# Altium PCB LEDControl1.PcbDoc (part 2 of 6)
Units mm, origin at the board's own origin, x right, y up, seen from the top; angles counter-clockwise.
Board outline 380 x 185 mm, 2 copper layers (Top Layer, Bottom Layer), stack 0.533 mm thick; 673 components, 368 nets, 1993 pads, 2553 vias.
Unrouted connection lines stored in the file: 1155.
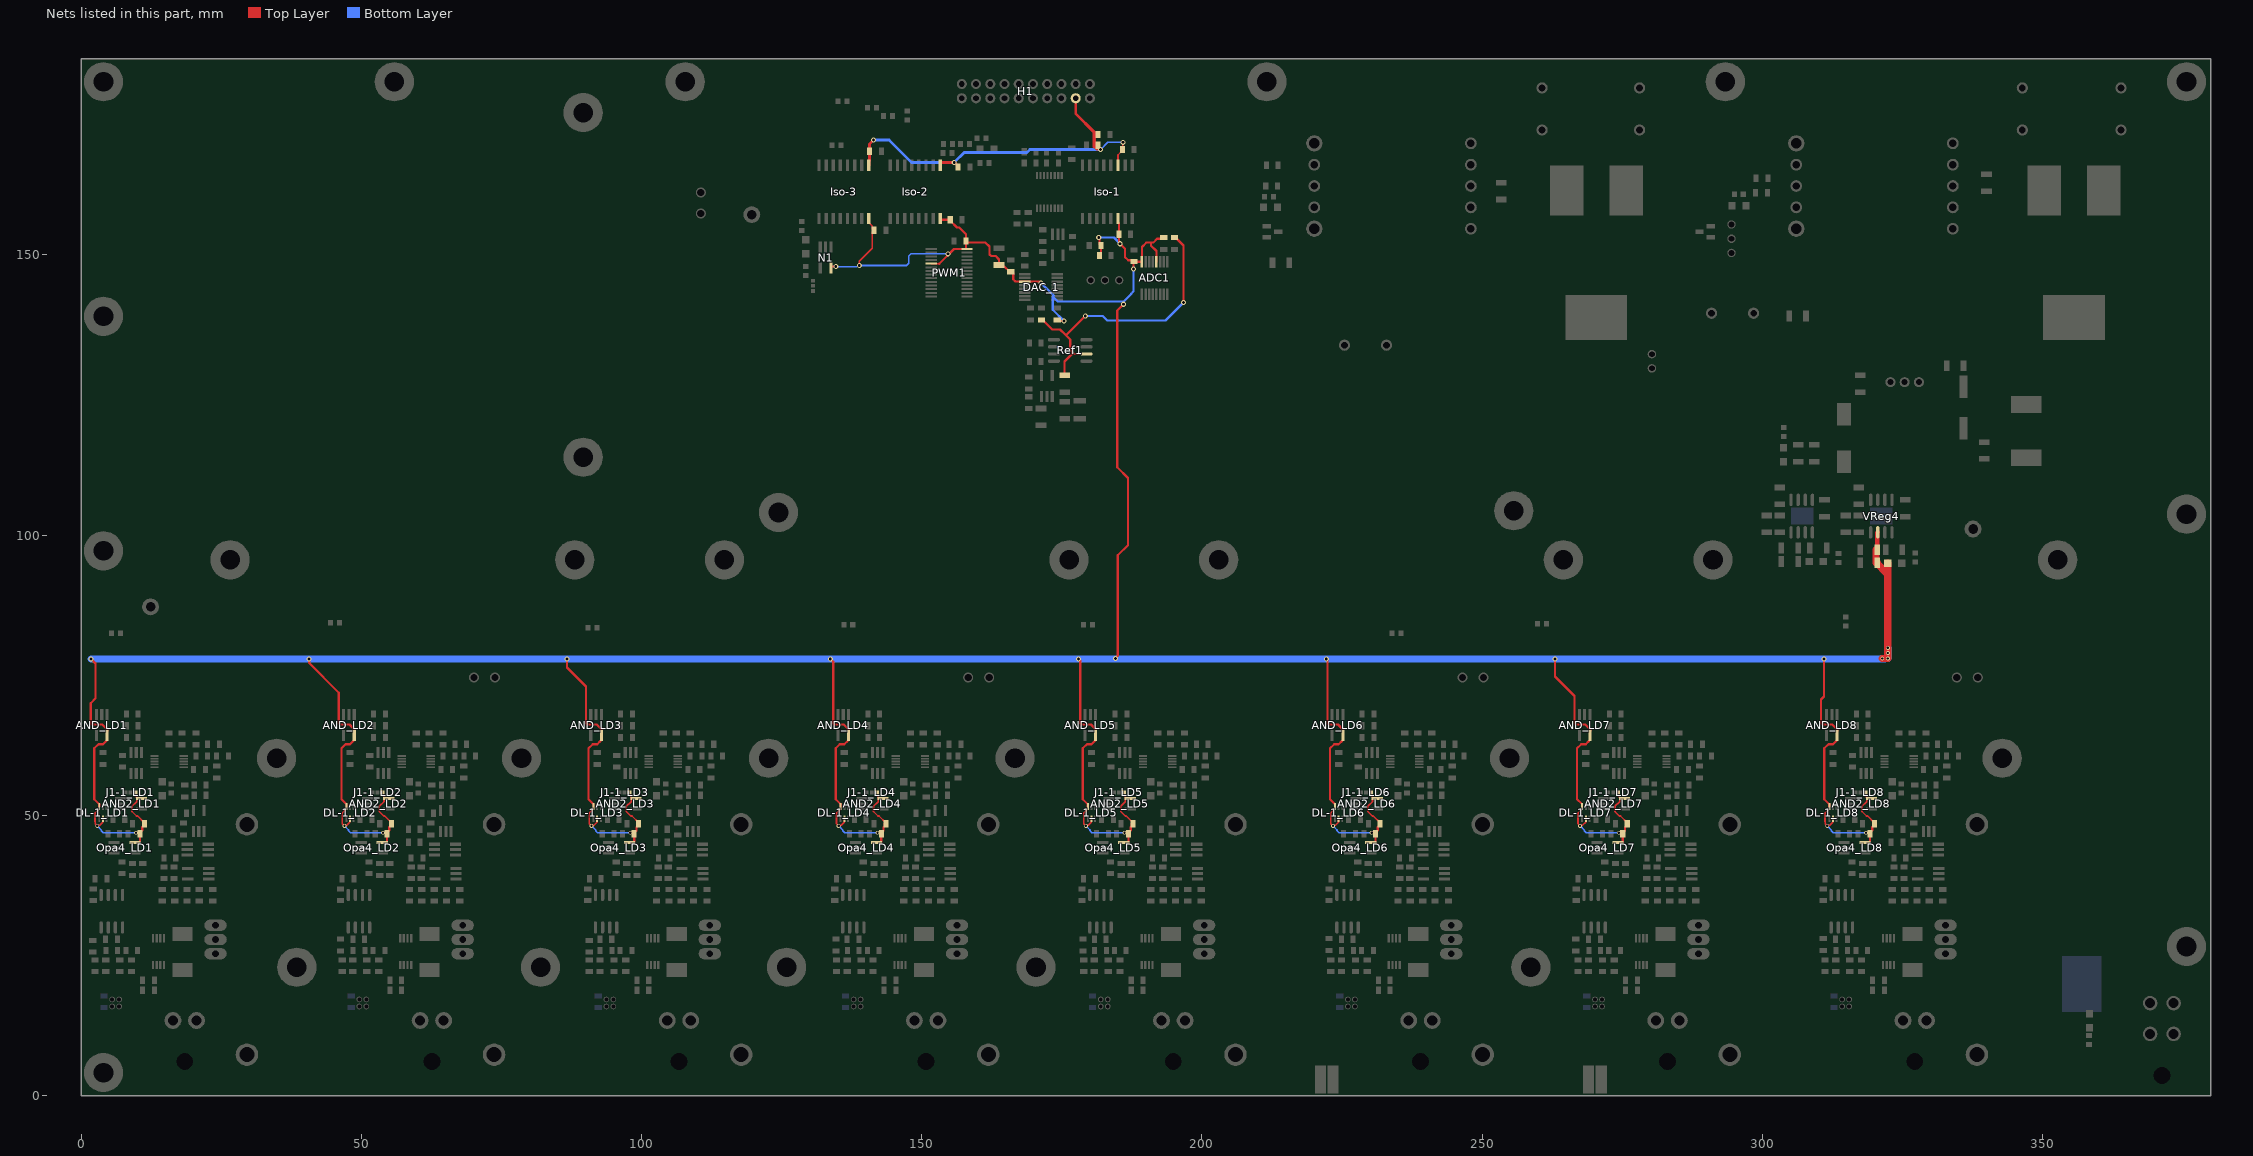
[diagram p2: the nets of this part, all layers, seen from the top]

## Components (designator, comment, footprint, x,y, rotation, side; value= is the part's Value field where it differs from the comment) (continued)
S "0" 0805 22.6,60.6 r180 top (schematic designator R1-4)
S "0" 0805 273.8,39.3 r90 top (schematic designator R1-3)
S "0" 0805 229.7,39.3 r90 top (schematic designator R1-3)
S "0" 0805 141.5,39.3 r90 top (schematic designator R1-3)
S "0" 0805 97.4,39.3 r90 top (schematic designator R1-3)
S "0" 0805 53.3,39.3 r90 top (schematic designator R1-3)
S "0" 0805 9.2,39.3 r90 top (schematic designator R1-3)
S "0" 0805 282.9,48.6 r270 top (schematic designator R1-2)
S "0" 0805 238.8,48.6 r270 top (schematic designator R1-2)
S "0" 0805 150.6,48.6 r270 top (schematic designator R1-2)
S "0" 0805 106.5,48.6 r270 top (schematic designator R1-2)
S "0" 0805 62.4,48.6 r270 top (schematic designator R1-2)
S "0" 0805 18.3,48.6 r270 top (schematic designator R1-2)
Sw1_LD1 "Switch_Analog_1" SOT23-6 18.95,44.85 r0 top (schematic designator Sw1)
Sw1_LD2 "Switch_Analog_1" SOT23-6 63.05,44.85 r0 top (schematic designator Sw1)
Sw1_LD3 "Switch_Analog_1" SOT23-6 107.15,44.85 r0 top (schematic designator Sw1)
Sw1_LD4 "Switch_Analog_1" SOT23-6 151.25,44.85 r0 top (schematic designator Sw1)
Sw1_LD5 "Switch_Analog_1" SOT23-6 195.35,44.85 r0 top (schematic designator Sw1)
Sw1_LD6 "Switch_Analog_1" SOT23-6 239.45,44.85 r0 top (schematic designator Sw1)
Sw1_LD7 "Switch_Analog_1" SOT23-6 283.55,44.85 r0 top (schematic designator Sw1)
Sw1_LD8 "Switch_Analog_1" SOT23-6 327.65,44.85 r0 top (schematic designator Sw1)
Sw2_LD1 "Switch_Analog_2" 10-VSSOP 13.1,60.6 r0 top (schematic designator Sw2)
Sw2_LD2 "Switch_Analog_2" 10-VSSOP 57.2,60.6 r0 top (schematic designator Sw2)
Sw2_LD3 "Switch_Analog_2" 10-VSSOP 101.3,60.6 r0 top (schematic designator Sw2)
Sw2_LD4 "Switch_Analog_2" 10-VSSOP 145.4,60.6 r0 top (schematic designator Sw2)
Sw2_LD5 "Switch_Analog_2" 10-VSSOP 189.5,60.6 r0 top (schematic designator Sw2)
Sw2_LD6 "Switch_Analog_2" 10-VSSOP 233.6,60.6 r0 top (schematic designator Sw2)
Sw2_LD7 "Switch_Analog_2" 10-VSSOP 277.7,60.6 r0 top (schematic designator Sw2)
Sw2_LD8 "Switch_Analog_2" 10-VSSOP 321.8,60.6 r0 top (schematic designator Sw2)
Sw3_LD1 "Switch_Analog_1" SOT23-6 8.9,57.45 r90 top (schematic designator Sw3)
Sw3_LD2 "Switch_Analog_1" SOT23-6 53,57.45 r90 top (schematic designator Sw3)
Sw3_LD3 "Switch_Analog_1" SOT23-6 97.1,57.45 r90 top (schematic designator Sw3)
Sw3_LD4 "Switch_Analog_1" SOT23-6 141.2,57.45 r90 top (schematic designator Sw3)
Sw3_LD5 "Switch_Analog_1" SOT23-6 185.3,57.45 r90 top (schematic designator Sw3)
Sw3_LD6 "Switch_Analog_1" SOT23-6 229.4,57.45 r90 top (schematic designator Sw3)
Sw3_LD7 "Switch_Analog_1" SOT23-6 273.5,57.45 r90 top (schematic designator Sw3)
Sw3_LD8 "Switch_Analog_1" SOT23-6 317.6,57.45 r90 top (schematic designator Sw3)
Sw-1 "MOSFET-N" SOT23-3 211.6,155.1 r0 top
Sw-2 "MOSFET-N" SOT23-3 290.8,153.2 r180 top
T1 "TEstPoint" TestPoint 337.6,101.1 r0 top
T2 "TEstPoint" TestPoint 12.4,87.2 r0 top
T3 "TEstPoint" TestPoint 119.7,157.2 r0 top
VReg3 "5VReg" 8-SOIC 305.13,100.5 r90 top
VReg4 "3V3Reg" 8-SOIC 319.33,100.5 r90 top
Vreg5 "PS1" PowerSupplySwitch 327.94,127.3 r180 top
VReg_1 "VReg_Adj" VReg_SixteenthBrick 248,154.68 r180 top
VReg_2 "VReg_Adj" VReg_SixteenthBrick 334,154.68 r180 top

## Footprints (in the part's own frame and the unit in brackets; to place one, negate y for a bottom-side part, rotate by r counter-clockwise, add the part's x,y. Pads: shape width x height; smd on the part's side, far side on the other; paste and mask are expansions set on the pad)
"6-TSSOP / SC-70-6" [mm]
  rect 1.2x0.35 smd mask+0.05: 1(0,0) 2(0,-0.65) 3(0,-1.3) 4(2.2,-1.3) 5(2.2,-0.65) 6(2.2,0)
8-SOIC [mm]
  oval 2.2x0.6 smd: 1(0,0) 2(0,-1.27) 3(0,-2.54) 4(0,-3.81) 5(5.8,-3.81) 6(5.8,-2.54) 7(5.8,-1.27) 8(5.8,0)
  Top Layer region: 1.7,-3.456 4.1,-3.456 4.1,-0.356 1.7,-0.356
  silkscreen extent 0.38,0.72 0.62,0.97, body extent 0.9,-4.41 4.9,0.6, height 1.75
8-SOIC-NoHeatPad [mm]
  oval 2.2x0.6 smd: 1(0,0) 2(0,-1.27) 3(0,-2.54) 4(0,-3.81) 5(5.8,-3.81) 6(5.8,-2.54) 7(5.8,-1.27) 8(5.8,0)
  silkscreen extent 0.38,0.72 0.62,0.97, body extent 0.9,-4.41 4.9,0.6, height 1.75
8-TSSOP [mm]
  rect 1.45x0.4 smd: 1(0,0) 2(0,-0.65) 3(0,-1.3) 4(0,-1.95) 5(4.8,-1.95) 6(4.8,-1.3) 7(4.8,-0.65) 8(4.8,0)
10-VSSOP [mm]
  rect 1.5x0.3 smd mask+0.02: 1(0,0) 2(0,-0.5) 3(0,-1) 4(0,-1.5) 5(0,-2) 6(5.2,-2) 7(5.2,-1.5) 8(5.2,-1) 9(5.2,-0.5) 10(5.2,0)
  silkscreen extent 1.4,-1.98 3.84,0.15
16-QSOP [mil]
  rect 50x15 smd mask+1.97: 1(0,0) 2(0,-25) 3(0,-50) 4(0,-75) 5(0,-100) 6(0,-125) 7(0,-150) 8(0,-175) 9(230,-175) 10(230,-150) 11(230,-125) 12(230,-100) 13(230,-75) 14(230,-50) 15(230,-25) 16(230,0)
"16-SOIC Wide" [mm]
  rect 2x0.6 smd mask+0.05: 1(0,0) 2(0,-1.27) 3(0,-2.54) 4(0,-3.81) 5(0,-5.08) 6(0,-6.35) 7(0,-7.62) 8(0,-8.89) 9(9.5,-8.89) 10(9.5,-7.62) 11(9.5,-6.35) 12(9.5,-5.08) 13(9.5,-3.81) 14(9.5,-2.54) 15(9.5,-1.27) 16(9.5,0)
16-TSSOP [mm]
  rect 2x0.45 smd mask+0.02: 1(0,0) 2(0,-0.65) 3(0,-1.3) 4(0,-1.95) 5(0,-2.6) 6(0,-3.25) 7(0,-3.9) 8(0,-4.55) 9(5.8,-4.55) 10(5.8,-3.9) 11(5.8,-3.25) 12(5.8,-2.6) 13(5.8,-1.95) 14(5.8,-1.3) 15(5.8,-0.65) 16(5.8,0)
  silkscreen extent 1.4,-4.65 4.4,0.15
28-TSSOP [mm]
  rect 2x0.35 smd mask+0.05: 1(0,0) 2(0,-0.65) 3(0,-1.3) 4(0,-1.95) 5(0,-2.6) 6(0,-3.25) 7(0,-3.9) 8(0,-4.55) 9(0,-5.2) 10(0,-5.85) 11(0,-6.5) 12(0,-7.15) 13(0,-7.8) 14(0,-8.45) 15(6.4,-8.45) 16(6.4,-7.8) 17(6.4,-7.15) 18(6.4,-6.5) 19(6.4,-5.85) 20(6.4,-5.2) 21(6.4,-4.55) 22(6.4,-3.9) 23(6.4,-3.25) 24(6.4,-2.6) 25(6.4,-1.95) 26(6.4,-1.3) 27(6.4,-0.65) 28(6.4,0)
0603 [mm]
  rect 0.9x1 smd mask+0.05: 1(0,0) 2(1.6,0)
0805 [mm]
  rect 0.9x1.3 smd: 1(2.1,0) 2(0,0)
1206 [mm]
  rect 1x1.9 smd mask+0.05: 1(0,0) 2(3,0)
1206_Wide [mm]
  rect 1x2.2 smd mask+0.05: 1(0,0) 2(3.2,0)
2512 [mm]
  rect 2.5x3.6 smd mask+0.05: 1(0,0) 2(6.4,0)
CapElec [mm]
  round 2 hole 1.2 mask+0.05: 1(-3.75,0) 2(3.75,0)
  silkscreen extent -8,-8 8,8
Connector_M5 [mm]
  round 1 hole 0.7 mask+0.05: 1(0,0) 2(0,-1.25) 3(1.25,-1.25) 4(1.25,0)
  silkscreen extent -3.37,-4.62 4.62,3.37
ElectrolyticCapacitor [mm]
  rect 1.5x4 smd: 1(0,-3.7) 2(0,3.7)
  silkscreen extent -4.1,-4.4 4.1,4.4
Fan1 [mm]
  round 7 hole 3.5 mask+0.05: 0(0,0) 0(61.5,0)
  round 1.8 hole 1.3 mask+0.05: 1(43.5,-21) 2(47.25,-21)
  silkscreen extent 10,-21 50,-21
FerriteBead1 [mm]
  rect 4x2.5 smd mask+0.05: 1(0,0) 2(8.5,0)
  silkscreen extent 0,-2 8.5,2
GndConnector [mm]
  rect 10x5 smd mask+0.1: 1(0,2) 2(0,0)
"Header Mini-Fit Jr 172648" [mm]
  round 3 hole 1.8 mask+0.05: 1(-2.1,7.3) 2(2.1,7.3)
  round 0 hole 3 unplated mask+0.05: 3(0,0)
  silkscreen extent -2,-6.6 2,-6.6
"Header Molex Mini-Fit Jr 5569 - duplicate" [mm]
  round 2.6 hole 1.8 mask+0.05: 1(0,0) 2(4.2,0) 3(0,5.5) 4(4.2,5.5)
  round 0 hole 3 unplated mask+0.05: 5(2.1,-7.4)
  silkscreen extent 0,-11 3.81,-11
"HeaderRA 2x10" [mm]
  round 1.8 hole 1 mask+0.05: 1(0,0) 2(2.54,0) 3(5.08,0) 4(7.62,0) 5(10.16,0) 6(12.7,0) 7(15.24,0) 8(17.78,0) 9(20.32,0) 10(22.86,0) 11(22.86,-2.54) 12(20.32,-2.54) 13(17.78,-2.54) 14(15.24,-2.54) 15(12.7,-2.54) 16(10.16,-2.54) 17(7.62,-2.54) 18(5.08,-2.54) 19(2.54,-2.54) 20(0,-2.54)
  silkscreen extent 0,3.5 22.86,3.5
Inductor1 [mm]
  rect 3x5.4 smd: 1(-0.068,-0.142) 2(9.432,-0.142)
  silkscreen extent -1.32,-6.14 10.68,5.86
Inductor_HighC [mm]
  rect 6x9 smd mask+0.05: 1(0,0) 2(10.65,0)
  rect 11x8 smd mask+0.05: 3(5.325,22.65)
  silkscreen extent -8.5,3.81 19.05,22.86
Jumper [mm]
  round 1.5 hole 1.02 mask+0.05: 1(0,0) 2(2.54,0) 3(5.08,0)
Jumper2_Pins [mm]
  round 1.5 hole 1.02 mask+0.05: 1(0,0) 2(2.54,0)
Jumper3B [mm]
  rect 0.7x0.7 smd mask+0.05: 1(0,0) 2(0.9,0) 3(1.8,0)
JumperHighC2 [mm]
  rect 5x2 smd mask+0.15: 1(0,1.31) 2(0,-0.95)
LEDindicator [mm]
  rect 1.3x1.3 smd: 1(0,0) 2(2.5,0)
  Top Layer lines w0.254: 2.5,0 cw(c2.5,0.2) 2.3,0.2
LEDIndicator [mm]
  rect 1.3x1.3 smd: 1(0,0) 2(2.5,0)
  Top Layer lines w0.254: 2.3,0.2 ccw(c2.5,0.2) 2.5,0
MOSFET_w_Heatsink [mm]
  round 4 hole 2.67 mask+0.05: 0(-5.6,20.55) 0(-5.6,-20.55)
  oval 4x2 hole 1.2 mask+0.05: 1(0,-2.54) 2(0,0) 3(0,2.54)
  silkscreen extent -20,-27.5 -2.81,27.5
PowerSupplySwitch [mm]
  round 1.8 hole 1.1: 1(0,0) 2(2.54,0) 3(5.08,0)
  silkscreen extent -3,-2 8,17.6
SOT23-3 [mm]
  rect 1.5x0.8 smd mask+0.02: 1(0,0) 2(0,-1.9) 3(2,-0.95)
SOT23-5 [mm]
  rect 2x0.55 smd mask+0.02: 1(0,0) 2(0,-0.95) 3(0,-1.9) 4(3.75,-1.9) 5(3.75,0)
SOT23-6 [mm]
  rect 2x0.55 smd mask+0.02: 1(0,0) 2(0,-0.95) 3(0,-1.9) 4(3.75,-1.9) 5(3.75,-0.95) 6(3.75,0)
TestPoint [mm]
  round 3 hole 1.7 mask+0.05: 1(0,0)
  silkscreen extent -1.8,-1.8 1.8,1.8
VReg_SixteenthBrick [mm]
  round 2.1 hole 1.3 mask+0.05: 1(0,0) 2(0,-7.62) 3(0,-15.24) 5(27.94,-11.43) 6(27.94,-7.62) 7(27.94,-3.81) 9(0,-3.81) 10(0,-11.43)
  round 2.9 hole 1.85 mask+0.05: 4(27.94,-15.24) 8(27.94,0)
  silkscreen extent -3,-26.5 31,11

## Part data
C1-1 C1-2 C1-3 C1-4 C1-5 C1-6 C1-7 C1-8 C1-10 C1-11 C1-12 C1-13 C1-14 C1-16 C1-99 C3-1 C3-1_LD1 C3-1_LD2 C3-1_LD3 C3-1_LD4 C3-1_LD5 C3-1_LD6 C3-1_LD7 C3-1_LD8 C3-2 C3-2_LD1 C3-2_LD2 C3-2_LD3 C3-2_LD4 C3-2_LD5 C3-2_LD6 C3-2_LD7 C3-2_LD8 C4-1_LD1 C4-1_LD2 C4-1_LD3 C4-1_LD4 C4-1_LD5 C4-1_LD6 C4-1_LD7 C4-1_LD8 C4-2_LD1 C4-2_LD2 C4-2_LD3 C4-2_LD4 C4-2_LD5 C4-2_LD6 C4-2_LD7 C4-2_LD8 C4-3_LD1 C4-3_LD2 C4-3_LD3 C4-3_LD4 C4-3_LD5 C4-3_LD6 C4-3_LD7 C4-3_LD8 C4-4_LD1 C4-4_LD2 C4-4_LD3 C4-4_LD4 C4-4_LD5 C4-4_LD6 C4-4_LD7 C4-4_LD8 C4-5_LD1 C4-5_LD2 C4-5_LD3 C4-5_LD4 C4-5_LD5 C4-5_LD6 C4-5_LD7 C4-5_LD8 C4-6_LD1 C4-6_LD2 C4-6_LD3 C4-6_LD4 C4-6_LD5 C4-6_LD6 C4-6_LD7 C4-6_LD8 C4-7_LD1 C4-7_LD2 C4-7_LD3 C4-7_LD4 C4-7_LD5 C4-7_LD6 C4-7_LD7 C4-7_LD8 C4-8_LD1 C4-8_LD2 C4-8_LD3 C4-8_LD4 C4-8_LD5 C4-8_LD6 C4-8_LD7 C4-8_LD8 C5-1_LD1 C5-1_LD2 C5-1_LD3 C5-1_LD4 C5-1_LD5 C5-1_LD6 C5-1_LD7 C5-1_LD8 C6-1: library part Capacitor1
  C5-1_LD1 C5-1_LD2 C5-1_LD3 C5-1_LD4 C5-1_LD5 C5-1_LD6 C5-1_LD7 C5-1_LD8: Digikey P/N=1276-1066-1-ND
C1-1_LD1 C1-1_LD2 C1-1_LD3 C1-1_LD4 C1-1_LD5 C1-1_LD6 C1-1_LD7 C1-1_LD8 C1-2_LD1 C1-2_LD2 C1-2_LD3 C1-2_LD4 C1-2_LD5 C1-2_LD6 C1-2_LD7 C1-2_LD8 C2-1 C2-1_LD1 C2-1_LD2 C2-1_LD3 C2-1_LD4 C2-1_LD5 C2-1_LD6 C2-1_LD7 C2-1_LD8 C2-2 C2-2_LD1 C2-2_LD2 C2-2_LD3 C2-2_LD4 C2-2_LD5 C2-2_LD6 C2-2_LD7 C2-2_LD8 C2-3 C2-3_LD1 C2-3_LD2 C2-3_LD3 C2-3_LD4 C2-3_LD5 C2-3_LD6 C2-3_LD7 C2-3_LD8 C2-4 C2-4_LD1 C2-4_LD2 C2-4_LD3 C2-4_LD4 C2-4_LD5 C2-4_LD6 C2-4_LD7 C2-4_LD8 C2-5 C2-5_LD1 C2-5_LD2 C2-5_LD3 C2-5_LD4 C2-5_LD5 C2-5_LD6 C2-5_LD7 C2-5_LD8 C2-6 C2-6_LD1 C2-6_LD2 C2-6_LD3 C2-6_LD4 C2-6_LD5 C2-6_LD6 C2-6_LD7 C2-6_LD8 C2-7 C2-7_LD1 C2-7_LD2 C2-7_LD3 C2-7_LD4 C2-7_LD5 C2-7_LD6 C2-7_LD7 C2-7_LD8 C2-8 C2-9 C2-10 C2-11 C2-12 C2-13 C2-14 C2-15 C2-16 C2-17 C2-18 C2-19 C2-20 C2-21 C2-22 C2-23 C4-1 C5-1: library part "Cap 0805", "Capacitor"
  C1-1_LD1 C1-1_LD2 C1-1_LD3 C1-1_LD4 C1-1_LD5 C1-1_LD6 C1-1_LD7 C1-1_LD8 C5-1: Digikey P/N=311-4178-1-ND
  C1-2_LD1 C1-2_LD2 C1-2_LD3 C1-2_LD4 C1-2_LD5 C1-2_LD6 C1-2_LD7 C1-2_LD8: Digikey P/N=399-15465-1-ND
  C2-1 C2-2 C2-3 C2-4 C2-5 C2-6 C2-8 C2-9 C2-10 C2-11 C2-16 C2-17 C2-18 C2-19 C2-20 C2-21: Digikey P/N=490-14439-1-ND
  C2-1_LD1 C2-1_LD2 C2-1_LD3 C2-1_LD4 C2-1_LD5 C2-1_LD6 C2-1_LD7 C2-1_LD8 C2-2_LD1 C2-2_LD2 C2-2_LD3 C2-2_LD4 C2-2_LD5 C2-2_LD6 C2-2_LD7 C2-2_LD8 C2-3_LD1 C2-3_LD2 C2-3_LD3 C2-3_LD4 C2-3_LD5 C2-3_LD6 C2-3_LD7 C2-3_LD8 C2-4_LD1 C2-4_LD2 C2-4_LD3 C2-4_LD4 C2-4_LD5 C2-4_LD6 C2-4_LD7 C2-4_LD8 C2-5_LD1 C2-5_LD2 C2-5_LD3 C2-5_LD4 C2-5_LD5 C2-5_LD6 C2-5_LD7 C2-5_LD8 C2-6_LD1 C2-6_LD2 C2-6_LD3 C2-6_LD4 C2-6_LD5 C2-6_LD6 C2-6_LD7 C2-6_LD8 C2-7_LD1 C2-7_LD2 C2-7_LD3 C2-7_LD4 C2-7_LD5 C2-7_LD6 C2-7_LD7 C2-7_LD8: Digikey P/N="478-13047-1-ND, 13-CC0805GRNPO9BN390CT-ND"
  C2-7 C2-12 C2-13 C2-14 C2-15 C2-22 C2-23: Digikey P/N=587-3485-1-ND
  C4-1: Digikey P/N=445-6984-1-ND
CE-1 CE-2 CE-3 CE-4 CE-5 CE-6: library part CapElectrolytic
  CE-1 CE-2 CE-4 CE-6: Digikey P/N=565-3414-ND
  CE-3 CE-5: Digikey P/N=732-9249-1-ND
CE-7: library part CapElectrolytic2, "ElectrolyticCap", Digikey P/N=PCE5120CT-ND
DL-1_LD1 DL-1_LD2 DL-1_LD3 DL-1_LD4 DL-1_LD5 DL-1_LD6 DL-1_LD7 DL-1_LD8: "D-Latch", Digikey P/N=296-16998-1-ND, FP=6-TSSOP
I1 I2: library part Inductor1, Digikey P/N=732-13630-ND
I3: library part Inductor3, "Inductor", Digikey P/N=732-11747-1-ND
PWM1: "PWM", Digikey P/N=568-11925-1-ND
R0-1 R0-2 R1-1 R1-1_LD1 R1-1_LD2 R1-1_LD3 R1-1_LD4 R1-1_LD5 R1-1_LD6 R1-1_LD7 R1-1_LD8 R1-2 R1-2 R1-2_LD5 R1-3_LD5 R1-3_LD8 R1-4 R1-5_LD1 R1-5_LD2 R1-5_LD3 R1-5_LD4 R1-5_LD5 R1-5_LD6 R1-5_LD7 R1-5_LD8 R1-6_LD5 R1-7_LD5 R2-1_LD1 R2-1_LD2 R2-1_LD3 R2-1_LD4 R2-1_LD5 R2-1_LD6 R2-1_LD7 R2-1_LD8 R3-1 R3-1_LD1 R3-1_LD2 R3-1_LD3 R3-1_LD4 R3-1_LD5 R3-1_LD6 R3-1_LD7 R3-1_LD8 R3-2 R3-2_LD1 R3-2_LD2 R3-2_LD3 R3-2_LD4 R3-2_LD5 R3-2_LD6 R3-2_LD7 R3-2_LD8 R3-3 R3-3_LD1 R3-3_LD2 R3-3_LD3 R3-3_LD4 R3-3_LD5 R3-3_LD6 R3-3_LD7 R3-3_LD8 R3-4 R3-4_LD1 R3-4_LD2 R3-4_LD3 R3-4_LD4 R3-4_LD5 R3-4_LD5 R3-4_LD6 R3-4_LD7 R3-4_LD8 R4-1_LD1 R4-1_LD2 R4-1_LD3 R4-1_LD4 R4-1_LD5 R4-1_LD6 R4-1_LD7 R4-1_LD8 R4-2 R5-1 R5-1_LD1 R5-1_LD2 R5-1_LD3 R5-1_LD4 R5-1_LD5 R5-1_LD6 R5-1_LD7 R5-1_LD8 R5-2 R6-1_LD1 R6-1_LD2 R6-1_LD3 R6-1_LD4 R6-1_LD5 R6-1_LD6 R6-1_LD7 R6-1_LD8 R7-1 R7-1_LD1 R7-1_LD2 R7-1_LD3 R7-1_LD4 R7-1_LD5 R7-1_LD6 R7-1_LD7 R7-1_LD8 R7-2_LD1 R7-2_LD2 R7-2_LD3 R7-2_LD4 R7-2_LD5 R7-2_LD6 R7-2_LD7 R7-2_LD8 R7-3_LD1 R7-3_LD2 R7-3_LD3 R7-3_LD4 R7-3_LD5 R7-3_LD6 R7-3_LD7 R7-3_LD8 R7-4_LD1 R7-4_LD2 R7-4_LD3 R7-4_LD4 R7-4_LD5 R7-4_LD6 R7-4_LD7 R7-4_LD8 R7-5_LD1 R7-5_LD2 R7-5_LD3 R7-5_LD4 R7-5_LD5 R7-5_LD6 R7-5_LD7 R7-5_LD8 R7-6_LD1 R7-6_LD2 R7-6_LD3 R7-6_LD4 R7-6_LD5 R7-6_LD6 R7-6_LD7 R7-6_LD8 R8-1 R8-1_LD1 R8-1_LD2 R8-1_LD3 R8-1_LD4 R8-1_LD5 R8-1_LD6 R8-1_LD7 R8-1_LD8 R9-1 R9-1_LD1 R9-1_LD2 R9-1_LD3 R9-1_LD4 R9-1_LD5 R9-1_LD6 R9-1_LD7 R9-1_LD8 R9-2_LD1 R9-2_LD2 R9-2_LD3 R9-2_LD4 R9-2_LD5 R9-2_LD6 R9-2_LD7 R9-2_LD8 R10-1 R10-1_LD1 R10-1_LD2 R10-1_LD3 R10-1_LD4 R10-1_LD5 R10-1_LD6 R10-1_LD7 R10-1_LD8 R11-1_LD1 R11-1_LD2 R11-1_LD3 R11-1_LD4 R11-1_LD5 R11-1_LD6 R11-1_LD7 R11-1_LD8 R11-2_LD1 R11-2_LD2 R11-2_LD3 R11-2_LD4 R11-2_LD5 R11-2_LD6 R11-2_LD7 R11-2_LD8 R12-1_LD1 R12-1_LD2 R12-1_LD3 R12-1_LD4 R12-1_LD5 R12-1_LD6 R12-1_LD7 R12-1_LD8 R14-1_LD1 R14-1_LD2 R14-1_LD3 R14-1_LD4 R14-1_LD5 R14-1_LD6 R14-1_LD7 R14-1_LD8 RLim-1 RLim-2 RPD_1 RPD_2 RPD_3 RPD_4 RPD_5 RPD_6 RPD_7 RPD_8 RPD_9 RPD_10 RPD_LD1 RPD_LD2 RPD_LD3 RPD_LD4 RPD_LD5 RPD_LD6 RPD_LD7 RPD_LD8 RTrim1 RTrim2 S S S S S S S S S S S S S S S S S S S S S S S S S S S S S S S S S S: library part Res1
  R1-1_LD1 R1-1_LD2 R1-1_LD3 R1-1_LD4 R1-1_LD5 R1-1_LD6 R1-1_LD7 R1-1_LD8 R1-2 R1-2_LD5 R1-3_LD5 R1-3_LD8 S S S S S S S S S S S S: Digikey P/N=511-SDR10EZPF10R0CT-ND
  R1-4 R1-5_LD1 R1-5_LD2 R1-5_LD3 R1-5_LD4 R1-5_LD5 R1-5_LD6 R1-5_LD7 R1-5_LD8 R3-4_LD5 S S S S S S: Digikey P/N=YAG3755CT-ND
  R1-6_LD5 S S S S S S S: Digikey P/N=732-1612-1-ND
  R1-7_LD5 S S S S S S S: Digikey P/N="732-1612-1-ND, 490-BLM21HE601SN1LCT-ND"
  R2-1_LD1 R2-1_LD2 R2-1_LD3 R2-1_LD4 R2-1_LD5 R2-1_LD6 R2-1_LD7 R2-1_LD8: Digikey P/N=738-RNCF0805DTE100RCT-ND,
  R3-1 R3-2: Digikey P/N=541-4663-1-ND
  R3-1_LD1 R3-1_LD2 R3-1_LD3 R3-1_LD4 R3-1_LD5 R3-1_LD6 R3-1_LD7 R3-1_LD8 R3-2_LD1 R3-2_LD2 R3-2_LD3 R3-2_LD4 R3-2_LD5 R3-2_LD6 R3-2_LD7 R3-2_LD8 R3-3_LD1 R3-3_LD2 R3-3_LD3 R3-3_LD4 R3-3_LD5 R3-3_LD6 R3-3_LD7 R3-3_LD8 R3-4_LD1 R3-4_LD2 R3-4_LD3 R3-4_LD4 R3-4_LD5 R3-4_LD6 R3-4_LD7 R3-4_LD8: Digikey P/N=P2.4KBFCT-ND
  R4-1_LD1 R4-1_LD2 R4-1_LD3 R4-1_LD4 R4-1_LD5 R4-1_LD6 R4-1_LD7 R4-1_LD8: Digikey P/N=408-RG2012N-4990-B-T5CT-ND
  R5-1_LD1 R5-1_LD2 R5-1_LD3 R5-1_LD4 R5-1_LD5 R5-1_LD6 R5-1_LD7 R5-1_LD8: Digikey P/N=4506-SEWF2512F3L00P9CT-ND
  R6-1_LD1 R6-1_LD2 R6-1_LD3 R6-1_LD4 R6-1_LD5 R6-1_LD6 R6-1_LD7 R6-1_LD8: Digikey P/N=738-RMCF0805JT12K0CT-ND
  R7-1: Digikey P/N=Y1625500R000B9W-ND
  R7-1_LD1 R7-1_LD2 R7-1_LD3 R7-1_LD4 R7-1_LD5 R7-1_LD6 R7-1_LD7 R7-1_LD8 R7-2_LD1 R7-2_LD2 R7-2_LD3 R7-2_LD4 R7-2_LD5 R7-2_LD6 R7-2_LD7 R7-2_LD8 R7-3_LD1 R7-3_LD2 R7-3_LD3 R7-3_LD4 R7-3_LD5 R7-3_LD6 R7-3_LD7 R7-3_LD8 R7-4_LD1 R7-4_LD2 R7-4_LD3 R7-4_LD4 R7-4_LD5 R7-4_LD6 R7-4_LD7 R7-4_LD8 R7-5_LD1 R7-5_LD2 R7-5_LD3 R7-5_LD4 R7-5_LD5 R7-5_LD6 R7-5_LD7 R7-5_LD8 R7-6_LD1 R7-6_LD2 R7-6_LD3 R7-6_LD4 R7-6_LD5 R7-6_LD6 R7-6_LD7 R7-6_LD8 R11-2_LD1 R11-2_LD2 R11-2_LD3 R11-2_LD4 R11-2_LD5 R11-2_LD6 R11-2_LD7 R11-2_LD8 R14-1_LD1 R14-1_LD2 R14-1_LD3 R14-1_LD4 R14-1_LD5 R14-1_LD6 R14-1_LD7 R14-1_LD8: Digikey P/N=Any
  R8-1: Digikey P/N=Y4023-5.00KDCT-ND
  R8-1_LD1 R8-1_LD2 R8-1_LD3 R8-1_LD4 R8-1_LD5 R8-1_LD6 R8-1_LD7 R8-1_LD8: Digikey P/N=408-2028-1-ND
  R9-1: Digikey P/N="YAG5091CT-ND, RMCF1206ZT0R00CT-ND"
  R10-1: Digikey P/N="RNCF0805BTE100RCT-ND, P20937CT-ND"
  R10-1_LD1 R10-1_LD2 R10-1_LD3 R10-1_LD4 R10-1_LD5 R10-1_LD6 R10-1_LD7 R10-1_LD8: Digikey P/N=TNPU49.9KBBCT-ND
  R11-1_LD1 R11-1_LD2 R11-1_LD3 R11-1_LD4 R11-1_LD5 R11-1_LD6 R11-1_LD7 R11-1_LD8: Digikey P/N=118-CR0805-FX-4993ELFCT-ND
  R12-1_LD1 R12-1_LD2 R12-1_LD3 R12-1_LD4 R12-1_LD5 R12-1_LD6 R12-1_LD7 R12-1_LD8: Digikey P/N=A140898CT-ND
  RLim-1 RLim-2: Digikey P/N=P680KDACT-ND
  RTrim1: Digikey P/N=P20688CT-ND
  RTrim2: Digikey P/N=P21058CT-ND
R2-1 R2-2 R2-3 R2-4 R2-5 R2-6 R2-7 R2-8 R6-1 R13-1_LD1 R13-1_LD2 R13-1_LD3 R13-1_LD4 R13-1_LD5 R13-1_LD6 R13-1_LD7 R13-1_LD8: library part Res1, "Resistor"
  R2-1 R2-2 R2-5 R2-6 R2-7 R2-8 R13-1_LD1 R13-1_LD2 R13-1_LD3 R13-1_LD4 R13-1_LD5 R13-1_LD6 R13-1_LD7 R13-1_LD8: Digikey P/N=2019-RK73B1JTTD201JCT-ND
  R2-3 R2-4: Digikey P/N=P2KBZCT-ND
  R6-1: Digikey P/N=541-4611-1-ND
Ref1: library part 2V5Ref, Digikey P/N=505-ADR4533BRZ-R7CT-ND
VReg3: library part "5V Reg LowNoise", "5V Regulator Low Noise", Digikey P/N=ADM7150ARDZ-5.0-R7CT-ND
VReg4: library part "5V Reg LowNoise", "3V3 Regulator Low Noise", Digikey P/N=505-ADM7150ARDZ-3.3-R7CT-ND
Vreg5: library part PowerSupplySwitching, "PowerSupplySwitching", Digikey P/N=945-2647-5-ND
ADC1: Digikey P/N=296-24101-1-ND
AND2_LD1 AND2_LD2 AND2_LD3 AND2_LD4 AND2_LD5 AND2_LD6 AND2_LD7 AND2_LD8 AND_LD1 AND_LD2 AND_LD3 AND_LD4 AND_LD5 AND_LD6 AND_LD7 AND_LD8: Digikey P/N=296-11601-1-ND
DAC_1: Digikey P/N=AD5669RARUZ-1
F1: Digikey P/N=4816-BPH853025R5-101TCT-ND
Fan1 Fan2 Fan3 Fan4 Fan5: Digikey P/N="603-2189-ND, 36-633-ND"
H1: Digikey P/N="SAM8104-ND, SAM8089-ND"
H2: Digikey P/N="WM23323-ND, 1470-4875-ND"
Iso-1: Digikey P/N=296-ISO1640QDWRQ1CT-ND
Iso-2 Iso-3: Digikey P/N=296-ISO7760FDWRCT-ND
J1-1_LD1 J1-1_LD2 J1-1_LD3 J1-1_LD4 J1-1_LD5 J1-1_LD6 J1-1_LD7 J1-1_LD8 J1-4 J1-5 J1-HB J_FAN: Digikey P/M="609-3461-ND, S9000-ND"
LED1-1 LED1-2 LED1-3 LED1-4 LED1-5 LED1-6 LED7 LED-8 LEDC_1_LD1 LEDC_1_LD2 LEDC_1_LD3 LEDC_1_LD4 LEDC_1_LD5 LEDC_1_LD6 LEDC_1_LD7 LEDC_1_LD8: Digikey=https://www.digikey.co.uk/product-detail/en/osram-opto-semiconductors-inc/LG-R971-KN-1/475-1410-1-ND/1802598, Digikey P/N=475-1410-1-ND
LED1_LD1 LED1_LD2 LED1_LD3 LED1_LD4 LED1_LD5 LED1_LD6 LED1_LD7 LED1_LD8: Digikey P/N="1726480102-ND, 900-2171590220-ND"
M1_LD1 M1_LD2 M1_LD3 M1_LD4 M1_LD5 M1_LD6 M1_LD7 M1_LD8: Digikey P/N="1727-5893-ND, PA-T21-38E-ND, C220-050-2AE-ND, 926-1009-ND"
N1: Digikey P/N=296-11607-1-ND
Opa1_LD1 Opa1_LD2 Opa1_LD3 Opa1_LD4 Opa1_LD5 Opa1_LD6 Opa1_LD7 Opa1_LD8: Digikey P/N="296-LM7321MFE/NOPBCT-ND, 505-AD8615AUJZ-REELCT-ND, MAX44250AUK+CT-ND"
Opa2_LD1 Opa2_LD2 Opa2_LD3 Opa2_LD4 Opa2_LD5 Opa2_LD6 Opa2_LD7 Opa2_LD8 Opa_1 OpAmp-2: Digikey P/N=296-OPA388QDBVRQ1CT-ND
Opa3_LD1 Opa3_LD2 Opa3_LD3 Opa3_LD4 Opa3_LD5 Opa3_LD6 Opa3_LD7 Opa3_LD8: Digikey P/N=296-INA296A3IDGKRCT-ND
Opa4_LD1 Opa4_LD2 Opa4_LD3 Opa4_LD4 Opa4_LD5 Opa4_LD6 Opa4_LD7 Opa4_LD8: Digikey P/N=296-32191-1-ND
Opa5_LD1 Opa5_LD2 Opa5_LD3 Opa5_LD4 Opa5_LD5 Opa5_LD6 Opa5_LD7 Opa5_LD8: Digikey P/N=296-INA821IDRCT-ND
OpAmp-1: Digikey P/N=505-ADUM3195WBRQZ-ND
Photo1_LD1 Photo1_LD2 Photo1_LD3 Photo1_LD4 Photo1_LD5 Photo1_LD6 Photo1_LD7 Photo1_LD8: Digikey P/N="839-1564-ND, 839-10-03879-ND"
Sw1_LD1 Sw1_LD2 Sw1_LD3 Sw1_LD4 Sw1_LD5 Sw1_LD6 Sw1_LD7 Sw1_LD8 Sw3_LD1 Sw3_LD2 Sw3_LD3 Sw3_LD4 Sw3_LD5 Sw3_LD6 Sw3_LD7 Sw3_LD8: Digikey P/N=296-21189-1-ND
Sw2_LD1 Sw2_LD2 Sw2_LD3 Sw2_LD4 Sw2_LD5 Sw2_LD6 Sw2_LD7 Sw2_LD8: Digikey P/N=296-32591-1-ND
Sw-1 Sw-2: Digikey P/N=DMG3402L-7DICT-ND
T1 T2 T3: Digikey P/N=36-5014-ND
VReg_1 VReg_2: Digikey P/N=285-I7A24045A033V-0F3-R-ND

## Free pads (board coordinates)
  round 7 hole 3.5 mask+0.05: 2(38.5,22.9) 3(82,22.9) 4(125.9,22.9) 5(170.4,22.9) 6(258.7,22.9) 7(375.7,26.6) 7(375.7,103.75) 8(34.9,60.2) 9(78.6,60.2) 10(122.7,60.2) 11(166.646,60.2) 12(254.9,60.2) 13(342.8,60.2) 14(375.7,180.9) 15(4,4.1) 15(4,97.2) 15(4,139.05) 15(4,180.9) 15(55.9,180.9) 15(107.8,180.9) 15(124.453,104.052) 15(211.6,180.9) 15(255.653,104.352) 15(293.4,180.9)
  rect 4x3 smd far side mask+0: 16(307.1,103.4) 17(321.2,103.4)

## Via types
v1: diameter 0.7, hole 0.4, Top Layer to Bottom Layer, tented both sides, 1874 vias
v2: diameter 0.8, hole 0.5, Top Layer to Bottom Layer, tented both sides, 512 vias
v3: diameter 0.9, hole 0.5, Top Layer to Bottom Layer, tented both sides, 158 vias
v4: diameter 1.27, hole 0.711, Top Layer to Bottom Layer, tented both sides, 8 vias
v5: diameter 1.2, hole 0.7, Top Layer to Bottom Layer, tented both sides, 1 vias

## Nets (pads, with @x,y where several pads share a name; then routed paths per layer and width w, separated by ;. In a path a pad name is that pad's centre, name@x,y a point inside that pad or via, vN(x,y) a via of type N, cw(c..) or ccw(c..) an arc to the next point about the centre after c; other vN are vias at no path point)
3V3: ADC1.12 ADC1.16 AND2_LD1.5 AND2_LD2.5 AND2_LD3.5 AND2_LD4.5 AND2_LD5.5 AND2_LD6.5 AND2_LD7.5 AND2_LD8.5 AND_LD1.5 AND_LD2.5 AND_LD3.5 AND_LD4.5 AND_LD5.5 AND_LD6.5 AND_LD7.5 AND_LD8.5 C1-2.1 C1-4.2 C1-6.2 C1-10.2 C1-13.2 C1-14.1 C2-3.2 C2-4.2 C2-23.2 C4-7_LD1.1 C4-7_LD2.1 C4-7_LD3.1 C4-7_LD4.1 C4-7_LD5.1 C4-7_LD6.1 C4-7_LD7.1 C4-7_LD8.1 DAC_1.3 DL-1_LD1.3 DL-1_LD1.5 DL-1_LD2.3 DL-1_LD2.5 DL-1_LD3.3 DL-1_LD3.5 DL-1_LD4.3 DL-1_LD4.5 DL-1_LD5.3 DL-1_LD5.5 DL-1_LD6.3 DL-1_LD6.5 DL-1_LD7.3 DL-1_LD7.5 DL-1_LD8.3 DL-1_LD8.5 Iso-1.14 Iso-2.16 Iso-3.16 J1-1_LD1.3 J1-1_LD2.3 J1-1_LD3.3 J1-1_LD4.3 J1-1_LD5.3 J1-1_LD6.3 J1-1_LD7.3 J1-1_LD8.3 LED1-1.2 N1.5 Opa4_LD1.5 Opa4_LD2.5 Opa4_LD3.5 Opa4_LD4.5 Opa4_LD5.5 Opa4_LD6.5 Opa4_LD7.5 Opa4_LD8.5 PWM1.5 PWM1.28 R1-1.1 R1-2.2@182,151.7 R4-2.1 R5-2.1 R6-1_LD1.1 R6-1_LD2.1 R6-1_LD3.1 R6-1_LD4.1 R6-1_LD5.1 R6-1_LD6.1 R6-1_LD7.1 R6-1_LD8.1 VReg4.2 | length 983.4
  Top Layer w0.3: DL-1_LD1.3@3.25,51.6 3.25,51.175 2.5,50.425 2.5,48.88 2.507,48.873 2.507,48.517 v1(2.891,48.133) 2.968,48.209 3.329,48.209 3.875,48.755 3.875,49.375 DL-1_LD1.5@3.9,49.4 ; J1-1_LD1.3@9.7,53.9 9.9,53.7 9.9,53.175 AND2_LD1.5@10.075,53 ; v1(9.8,46.9) 10.3,46.9 R6-1_LD1.1@10.5,46.7 ; AND2_LD1.5@10.8,53 AND2_LD1.5@10.075,53 ; C4-7_LD1.1@11.3,48.5 11.3,48.7 10.1,49.9 9.9,49.9 9.1,50.7 9.1,51.6 9.95,52.45 9.95,52.875 AND2_LD1.5@10.075,53 ; DL-1_LD2.3@47.35,51.6 47.35,51.175 46.6,50.425 46.6,48.88 46.607,48.873 46.607,48.517 v1(46.991,48.133) 47.068,48.209 47.429,48.209 47.975,48.755 47.975,49.375 DL-1_LD2.5@48,49.4 ; J1-1_LD2.3@53.8,53.9 54,53.7 54,53.175 AND2_LD2.5@54.175,53 ; v1(53.9,46.9) 54.4,46.9 R6-1_LD2.1@54.6,46.7 ; AND2_LD2.5@54.9,53 AND2_LD2.5@54.175,53 ; C4-7_LD2.1@55.4,48.5 55.4,48.7 54.2,49.9 54,49.9 53.2,50.7 53.2,51.6 54.05,52.45 54.05,52.875 AND2_LD2.5@54.175,53 ; DL-1_LD3.3@91.45,51.6 91.45,51.175 90.7,50.425 90.7,48.88 90.707,48.873 90.707,48.517 v1(91.091,48.133) 91.168,48.209 91.529,48.209 92.075,48.755 92.075,49.375 DL-1_LD3.5@92.1,49.4 ; J1-1_LD3.3@97.9,53.9 98.1,53.7 98.1,53.175 AND2_LD3.5@98.275,53 ; v1(98,46.9) 98.5,46.9 R6-1_LD3.1@98.7,46.7 ; AND2_LD3.5@99,53 AND2_LD3.5@98.275,53 ; C4-7_LD3.1@99.5,48.5 99.5,48.7 98.3,49.9 98.1,49.9 97.3,50.7 97.3,51.6 98.15,52.45 98.15,52.875 AND2_LD3.5@98.275,53 ; N1.5@133.8,147.65 133.8,147.801 133.925,147.926 v3(134.681,147.926) ; DL-1_LD4.3@135.55,51.6 135.55,51.175 134.8,50.425 134.8,48.88 134.807,48.873 134.807,48.517 v1(135.191,48.133) 135.268,48.209 135.629,48.209 136.175,48.755 136.175,49.375 DL-1_LD4.5@136.2,49.4 ; v3(138.874,148.133) 138.874,148.874 141.2,151.2 141.2,154.1 C1-6.2@141.5,154.4 141.2,154.7 141.2,155.18 140.58,155.8 Iso-3.16@140.58,156.5 ; J1-1_LD4.3@142,53.9 142.2,53.7 142.2,53.175 AND2_LD4.5@142.375,53 ; v1(142.1,46.9) 142.6,46.9 R6-1_LD4.1@142.8,46.7 ; AND2_LD4.5@143.1,53 AND2_LD4.5@142.375,53 ; C4-7_LD4.1@143.6,48.5 143.6,48.7 142.4,49.9 142.2,49.9 141.4,50.7 141.4,51.6 142.25,52.45 142.25,52.875 AND2_LD4.5@142.375,53 ; PWM1.5@151.7,148.45 153.15,148.45 ; DL-1_LD5.3@179.65,51.6 179.65,51.175 178.9,50.425 178.9,48.88 178.907,48.873 178.907,48.517 v1(179.291,48.133) 179.368,48.209 179.729,48.209 180.275,48.755 180.275,49.375 DL-1_LD5.5@180.3,49.4 ; J1-1_LD5.3@186.1,53.9 186.3,53.7 186.3,53.175 AND2_LD5.5@186.475,53 ; v1(186.2,46.9) 186.7,46.9 R6-1_LD5.1@186.9,46.7 ; AND2_LD5.5@187.2,53 AND2_LD5.5@186.475,53 ; C4-7_LD5.1@187.7,48.5 187.7,48.7 186.5,49.9 186.3,49.9 185.5,50.7 185.5,51.6 186.35,52.45 186.35,52.875 AND2_LD5.5@186.475,53 ; DL-1_LD6.3@223.75,51.6 223.75,51.175 223,50.425 223,48.88 223.007,48.873 223.007,48.517 v1(223.391,48.133) 223.468,48.209 223.829,48.209 224.375,48.755 224.375,49.375 DL-1_LD6.5@224.4,49.4 ; J1-1_LD6.3@230.2,53.9 230.4,53.7 230.4,53.175 AND2_LD6.5@230.575,53 ; v1(230.3,46.9) 230.8,46.9 R6-1_LD6.1@231,46.7 ; AND2_LD6.5@231.3,53 AND2_LD6.5@230.575,53 ; C4-7_LD6.1@231.8,48.5 231.8,48.7 230.6,49.9 230.4,49.9 229.6,50.7 229.6,51.6 230.45,52.45 230.45,52.875 AND2_LD6.5@230.575,53 ; DL-1_LD7.3@267.85,51.6 267.85,51.175 267.1,50.425 267.1,48.88 267.107,48.873 267.107,48.517 v1(267.491,48.133) 267.568,48.209 267.929,48.209 268.475,48.755 268.475,49.375 DL-1_LD7.5@268.5,49.4 ; J1-1_LD7.3@274.3,53.9 274.5,53.7 274.5,53.175 AND2_LD7.5@274.675,53 ; v1(274.4,46.9) 274.9,46.9 R6-1_LD7.1@275.1,46.7 ; AND2_LD7.5@275.4,53 AND2_LD7.5@274.675,53 ; C4-7_LD7.1@275.9,48.5 275.9,48.7 274.7,49.9 274.5,49.9 273.7,50.7 273.7,51.6 274.55,52.45 274.55,52.875 AND2_LD7.5@274.675,53 ; DL-1_LD8.3@311.95,51.6 311.95,51.175 311.2,50.425 311.2,48.88 311.207,48.873 311.207,48.517 v1(311.591,48.133) 311.668,48.209 312.029,48.209 312.575,48.755 312.575,49.375 DL-1_LD8.5@312.6,49.4 ; J1-1_LD8.3@318.4,53.9 318.6,53.7 318.6,53.175 AND2_LD8.5@318.775,53 ; v1(318.5,46.9) 319,46.9 R6-1_LD8.1@319.2,46.7 ; AND2_LD8.5@319.5,53 AND2_LD8.5@318.775,53 ; C4-7_LD8.1@320,48.5 320,48.7 318.8,49.9 318.6,49.9 317.8,50.7 317.8,51.6 318.65,52.45 318.65,52.875 AND2_LD8.5@318.775,53
  Top Layer w0.4: v3(1.8,77.9) 2.6,77.1 2.6,70.896 1.714,70.01 1.714,66.434 1.948,66.2 3.8,66.2 4.7,65.3 AND_LD1.5@4.7,65.1 ; DL-1_LD1.3@3.25,51.6 3.25,51.975 2.356,52.869 2.356,61.956 3.1,62.7 3.9,62.7 AND_LD1.5@4.487,63.287 ; Opa4_LD1.5@9.65,45.15 10.375,45.15 10.5,45.275 R6-1_LD1.1@10.5,46.7 10.5,46.9 10.9,47.3 10.9,47.9 11.1,48.1 C4-7_LD1.1@11.1,48.5 ; v3(40.7,77.9) 40.7,77.2 46.004,71.896 46.004,66.434 46.238,66.2 47.9,66.2 48.8,65.3 AND_LD2.5@48.8,65.1 ; DL-1_LD2.3@47.35,51.6 47.35,51.975 46.456,52.869 46.456,61.956 47.2,62.7 48,62.7 AND_LD2.5@48.587,63.287 ; Opa4_LD2.5@53.75,45.15 54.475,45.15 54.6,45.275 R6-1_LD2.1@54.6,46.7 54.6,46.9 55,47.3 55,47.9 55.2,48.1 C4-7_LD2.1@55.2,48.5 ; v3(86.7,77.9) 86.7,76.4 90.104,72.996 90.104,66.434 90.338,66.2 92,66.2 92.9,65.3 AND_LD3.5@92.9,65.1 ; DL-1_LD3.3@91.45,51.6 91.45,51.975 90.556,52.869 90.556,61.956 91.3,62.7 92.1,62.7 AND_LD3.5@92.687,63.287 ; Opa4_LD3.5@97.85,45.15 98.575,45.15 98.7,45.275 R6-1_LD3.1@98.7,46.7 98.7,46.9 99.1,47.3 99.1,47.9 99.3,48.1 C4-7_LD3.1@99.3,48.5 ; v3(133.7,77.9) 134.204,77.396 134.204,66.434 134.438,66.2 136.1,66.2 137,65.3 AND_LD4.5@137,65.1 ; DL-1_LD4.3@135.55,51.6 135.55,51.975 134.656,52.869 134.656,61.956 135.4,62.7 136.2,62.7 AND_LD4.5@136.787,63.287 ; Opa4_LD4.5@141.95,45.15 142.675,45.15 142.8,45.275 R6-1_LD4.1@142.8,46.7 142.8,46.9 143.2,47.3 143.2,47.9 143.4,48.1 C4-7_LD4.1@143.4,48.5 ; 153.15,148.45 155.75,151.05 PWM1.28@158.1,151.05 ; Iso-2.16@153.31,156.5 153.31,156.4 153.41,156.3 C1-4.2@155.1,156.3 155.1,156.1 156.3,154.9 156.7,154.9 157.9,153.7 C1-13.2@157.9,152.5 C1-13.2@157.9,152.45 ; PWM1.28@157.9,151.075 C1-13.2@157.9,152.45 ; C2-23.2@163.7,148.2 164,147.9 164.8,147.9 165.7,147 166.1,147 166.35,146.75 166.35,145.65 166.725,145.275 168.375,145.275 DAC_1.3@168.4,145.25 171.05,145.25 v3(171.3,145) ; C2-23.2@163.8,148.2 163.8,149.2 163.2,149.8 162.4,149.8 162.1,150.1 162.1,151.5 161.4,152.2 158.15,152.2 C1-13.2@157.9,152.45 ; R5-2.1@174.2,138.4 174.4,138.2 v3(175.4,138.2) ; v3(177.996,77.902) 178.304,77.594 178.304,66.434 178.538,66.2 180.2,66.2 181.1,65.3 AND_LD5.5@181.1,65.1 ; DL-1_LD5.3@179.65,51.6 179.65,51.975 178.756,52.869 178.756,61.956 179.5,62.7 180.3,62.7 AND_LD5.5@180.887,63.287 ; v3(181.6,153.1) 181.75,152.95 181.75,151.95 R1-2.2@182,151.7 182,150.4 181.7,150.1 R1-1.1@181.7,149.9 ; v3(184.6,78) 184.6,78.084 185,78.484 185,96.4 186.8,98.2 186.8,110.2 184.888,112.112 184.888,140.088 v3(186,141.2) ; Iso-1.14@185.04,156.5 185.04,155.8 185.2,155.64 C1-2.1@185.2,153.7 v3@185.2,152.335 ; v3(185.4,152) 186.3,151.1 186.3,149.6 186.85,149.05 187.65,149.05 C1-10.2@187.9,148.8 ; Opa4_LD5.5@186.05,45.15 186.775,45.15 186.9,45.275 R6-1_LD5.1@186.9,46.7 186.9,46.9 187.3,47.3 187.3,47.9 187.5,48.1 C4-7_LD5.1@187.5,48.5 ; v3(187.8,147.5) 187.8,148.7 C1-10.2@187.9,148.8 ; ADC1.12@191.9,148.8 191.9,150.69 190.9,151.69 190.9,152.2 ; R4-2.1@193.2,153.1 193,152.9 192,152.9 191.3,152.2 190.9,152.2 ; v3(222.2,77.9) 222.404,77.696 222.404,66.434 222.638,66.2 224.3,66.2 225.2,65.3 AND_LD6.5@225.2,65.1 ; DL-1_LD6.3@223.75,51.6 223.75,51.975 222.856,52.869 222.856,61.956 223.6,62.7 224.4,62.7 AND_LD6.5@224.987,63.287 ; Opa4_LD6.5@230.15,45.15 230.875,45.15 231,45.275 R6-1_LD6.1@231,46.7 231,46.9 231.4,47.3 231.4,47.9 231.6,48.1 C4-7_LD6.1@231.6,48.5 ; v3(263,77.9) 263,74.8 266.504,71.296 266.504,66.434 266.738,66.2 268.4,66.2 269.3,65.3 AND_LD7.5@269.3,65.1 ; DL-1_LD7.3@267.85,51.6 267.85,51.975 266.956,52.869 266.956,61.956 267.7,62.7 268.5,62.7 AND_LD7.5@269.087,63.287 ; Opa4_LD7.5@274.25,45.15 274.975,45.15 275.1,45.275 R6-1_LD7.1@275.1,46.7 275.1,46.9 275.5,47.3 275.5,47.9 275.7,48.1 C4-7_LD7.1@275.7,48.5 ; v3(311,77.9) 311,71.2 310.469,70.669 310.469,66.434 310.704,66.2 312.5,66.2 313.4,65.3 AND_LD8.5@313.4,65.1 ; DL-1_LD8.3@311.95,51.6 311.95,51.975 311.056,52.869 311.056,61.956 311.8,62.7 312.6,62.7 AND_LD8.5@313.187,63.287 ; Opa4_LD8.5@318.35,45.15 319.075,45.15 319.2,45.275 R6-1_LD8.1@319.2,46.7 319.2,46.9 319.6,47.3 319.6,47.9 319.8,48.1 C4-7_LD8.1@319.8,48.5 ; C1-10.2@187.9,148.8 ADC1.16@189.3,148.8 189.3,151.409 190.091,152.2 190.9,152.2
  Top Layer w0.8: C2-3.2@320.5,97.4 320.55,97.45 320.55,100.45 VReg4.2@320.6,100.5
  Top Layer w1.3: C2-4.2@320.3,95.1 C2-3.2@320.3,97.4 ; C2-4.2@320.5,95.1 320.5,94.95 322.05,93.4 322.4,93.4 ; v1(321.4,78) v1(322.4,78) v1(322.4,79.9) 322.4,93.4 ; LED1-1.2@322.4,95 322.4,93.4
  Bottom Layer w0.3: v1(2.891,48.133) 3.624,47.4 3.624,47.243 3.967,46.9 v1(9.8,46.9) ; v1(46.991,48.133) 47.724,47.4 47.724,47.243 48.067,46.9 v1(53.9,46.9) ; v1(91.091,48.133) 91.824,47.4 91.824,47.243 92.167,46.9 v1(98,46.9) ; v3(134.681,147.926) 134.687,147.919 v3@138.498,147.919 ; v1(135.191,48.133) 135.924,47.4 135.924,47.243 136.267,46.9 v1(142.1,46.9) ; v3(138.874,148.133) 147.333,148.133 147.7,148.5 147.7,149.8 148.1,150.2 v3(154.7,150.2) ; v1(179.291,48.133) 180.024,47.4 180.024,47.243 180.367,46.9 v1(186.2,46.9) ; v1(223.391,48.133) 224.124,47.4 224.124,47.243 224.467,46.9 v1(230.3,46.9) ; v1(267.491,48.133) 268.224,47.4 268.224,47.243 268.567,46.9 v1(274.4,46.9) ; v1(311.591,48.133) 312.324,47.4 312.324,47.243 312.667,46.9 v1(318.5,46.9)
  Bottom Layer w0.4: v3(171.3,145) 173.55,142.75 173.4,142.6 ; v3(175.4,138.2) 173.4,140.2 173.4,142.6 ; v3(181.6,153.1) 184.3,153.1 v3(185.4,152) ; v3(187.8,147.5) 187.8,143.5 187.4,143.1 187.413,143.1 187.431,143.082 186.049,141.7 174.3,141.7 173.4,142.6
  Bottom Layer w1.3: v3(1.8,77.9) v3(86.7,77.9) v3(133.7,77.9) 185.8,77.9 ; 185.9,77.9 v3(222.2,77.9) v3(263,77.9) v3(311,77.9) 321.9,77.9 ; v1(322.4,78) v1(322.4,79.9)
  other v1: 322.4,78.95
3V3_IN: C1-1.1 C1-3.2 C1-5.2 H1.12 Iso-1.3 Iso-2.1 Iso-3.1 R0-1.1 R0-2.2 | length 73
  Top Layer w0.3: Iso-1.3@185.04,166 185.04,167.84 185.8,168.6 C1-1.1@185.8,168.8 185.9,168.9 v3(185.9,170.1)
  Top Layer w0.5: Iso-3.1@140.58,166 140.58,166.7 140.7,166.82 C1-5.2@140.7,168.5 140.7,169.8 v3(141.4,170.5) ; Iso-2.1@153.31,166 Iso-2.1@153.31,166.45 ; Iso-2.1@153.31,166.7 Iso-2.1@153.31,166.45 ; C1-3.2@156.5,165.7 156.5,165.9 155.9,166.5 v3(155.8,166.5) 153.36,166.5 Iso-2.1@153.31,166.45 ; H1.12@177.48,177.96 177.48,175.22 180.8,171.9 ; 180.8,169.3 181.223,168.877 v3@181.5,168.877 ; R0-1.1@181.4,171.4 R0-1.1@181.5,171.5
  Top Layer w0.6: 180.8,169.3 180.8,171.4 ; 180.8,171.9 180.8,171.4 ; R0-1.1@181.4,171.4 180.8,171.4
  Bottom Layer w0.3: v3(181.9,168.8) 183.2,170.1 v3(185.9,170.1)
  Bottom Layer w0.5: v3(141.4,170.5) 144.2,170.5 148.2,166.5 v3(155.8,166.5) 157.6,168.3 168.8,168.3 169.3,168.8 v3(181.9,168.8)
3V3Ref: R8-1.1 Ref1.6 S.1@171.4,138.4 S.2@195.1,153.1 | length 52.8
  Top Layer w0.4: S.1@171.4,138.4 171.6,138.4 173.3,136.7 174.7,136.7 175.6,135.8 ; R8-1.1@175.5,128.5 175.5,131 177.017,132.517 ; v3(179.2,139.1) 175.9,135.8 175.6,135.8 ; Ref1.6@179.4,132.33 177.204,132.33 177.017,132.517 ; S.2@195.1,153.1 195.3,153.1 196.7,151.7 v3(196.7,141.5) ; 175.6,135.8 176.5,134.9 176.5,133.034 177.017,132.517
  Bottom Layer w0.4: v3(179.2,139.1) 182.3,139.1 183.1,138.3 193.5,138.3 v3(196.7,141.5)

## Text inside footprints (layer, text, board x,y; h text height)
ADC1: Top Overlay "1" at 190.3,144.8 h0.8 r90
CE-1: Top Overlay "+" at 261.172,166.679 h0.8 r90
CE-2: Top Overlay "+" at 219.829,133.428 h0.8
CE-3: Top Overlay "+" at 278.572,166.679 h0.8 r90
CE-4: Top Overlay "+" at 304.071,140.072 h0.8 r180
CE-5: Top Overlay "+" at 364.472,166.679 h0.8 r90
CE-6: Top Overlay "+" at 346.872,166.679 h0.8 r90
DAC_1: Top Overlay "1" at 170.2,145.55 h0.8
Fan1: Top Overlay "+" at 69.338,75.83 h2
Fan2: Top Overlay "+" at 157.538,75.83 h2
Fan3: Top Overlay "+" at 245.738,75.83 h2
Fan4: Top Overlay "+" at 333.938,75.83 h2
Fan5: Top Overlay "+" at 109.37,156.638 h2 r90
J1-4: Top Overlay "3" at 185.096,143.286 h0.8; Top Overlay "2" at 182.556,143.286 h0.8; Top Overlay "1" at 180.016,143.286 h0.8
J1-5: Top Overlay "1" at 296.714,150.216 h0.8 r90; Top Overlay "2" at 296.714,152.756 h0.8 r90; Top Overlay "3" at 296.714,155.296 h0.8 r90
J_FAN: Top Overlay "1" at 278.086,132.444 h0.8 r270; Top Overlay "2" at 278.086,129.904 h0.8 r270
LED1-1: Top Overlay "+" at 321.7,96.203 h1 r180
LED1-2: Top Overlay "+" at 359.603,15.3 h1 r90
LED1-3: Top Overlay "+" at 297.8,157.597 h1
LED1-4: Top Overlay "+" at 214.2,157.297 h1
LED1-5: Top Overlay "+" at 307.7,96.503 h1 r180
LED1-6: Top Overlay "+" at 302.597,112.4 h1 r270
LED7: Top Overlay "+" at 130.503,153.4 h1 r90
LED-8: Top Overlay "+" at 163.6,167.697 h1
LEDC_1_LD1: Top Overlay "+" at 13.297,52.8 h1 r270
LEDC_1_LD2: Top Overlay "+" at 57.397,52.8 h1 r270
LEDC_1_LD3: Top Overlay "+" at 101.497,52.8 h1 r270
LEDC_1_LD4: Top Overlay "+" at 145.597,52.8 h1 r270
LEDC_1_LD5: Top Overlay "+" at 189.697,52.8 h1 r270
LEDC_1_LD6: Top Overlay "+" at 233.797,52.8 h1 r270
LEDC_1_LD7: Top Overlay "+" at 277.897,52.8 h1 r270
LEDC_1_LD8: Top Overlay "+" at 321.997,52.8 h1 r270
Opa3_LD1: Top Overlay "1" at 14.65,26.923 h0.5 r270
Opa3_LD2: Top Overlay "1" at 58.75,26.923 h0.5 r270
Opa3_LD3: Top Overlay "1" at 102.85,26.923 h0.5 r270
Opa3_LD4: Top Overlay "1" at 146.95,26.923 h0.5 r270
Opa3_LD5: Top Overlay "1" at 191.05,26.923 h0.5 r270
Opa3_LD6: Top Overlay "1" at 235.15,26.923 h0.5 r270
Opa3_LD7: Top Overlay "1" at 279.25,26.923 h0.5 r270
Opa3_LD8: Top Overlay "1" at 323.35,26.923 h0.5 r270
Photo1_LD1: Top Overlay ">" at 5.843,15.142 h0.3 r270
Photo1_LD2: Top Overlay ">" at 49.943,15.142 h0.3 r270
Photo1_LD3: Top Overlay ">" at 94.043,15.142 h0.3 r270
Photo1_LD4: Top Overlay ">" at 138.143,15.142 h0.3 r270
Photo1_LD5: Top Overlay ">" at 182.243,15.142 h0.3 r270
Photo1_LD6: Top Overlay ">" at 226.343,15.142 h0.3 r270
Photo1_LD7: Top Overlay ">" at 270.443,15.142 h0.3 r270
Photo1_LD8: Top Overlay ">" at 314.543,15.142 h0.3 r270
T1: Top Overlay "GND" at 336.25,103.25 h1
T2: Top Overlay "GND" at 11.05,89.35 h1
T3: Top Overlay "GND" at 118.35,159.35 h1